# Altium PCB Cree_Testing_Board_R0.PcbDoc
Units mil, origin at the board's own origin, x right, y up, seen from the top; angles counter-clockwise.
Board outline 1100 x 975 mil, 2 copper layers (Top Layer, Bottom Layer); 8 components, 7 nets, 30 pads, 0 vias.
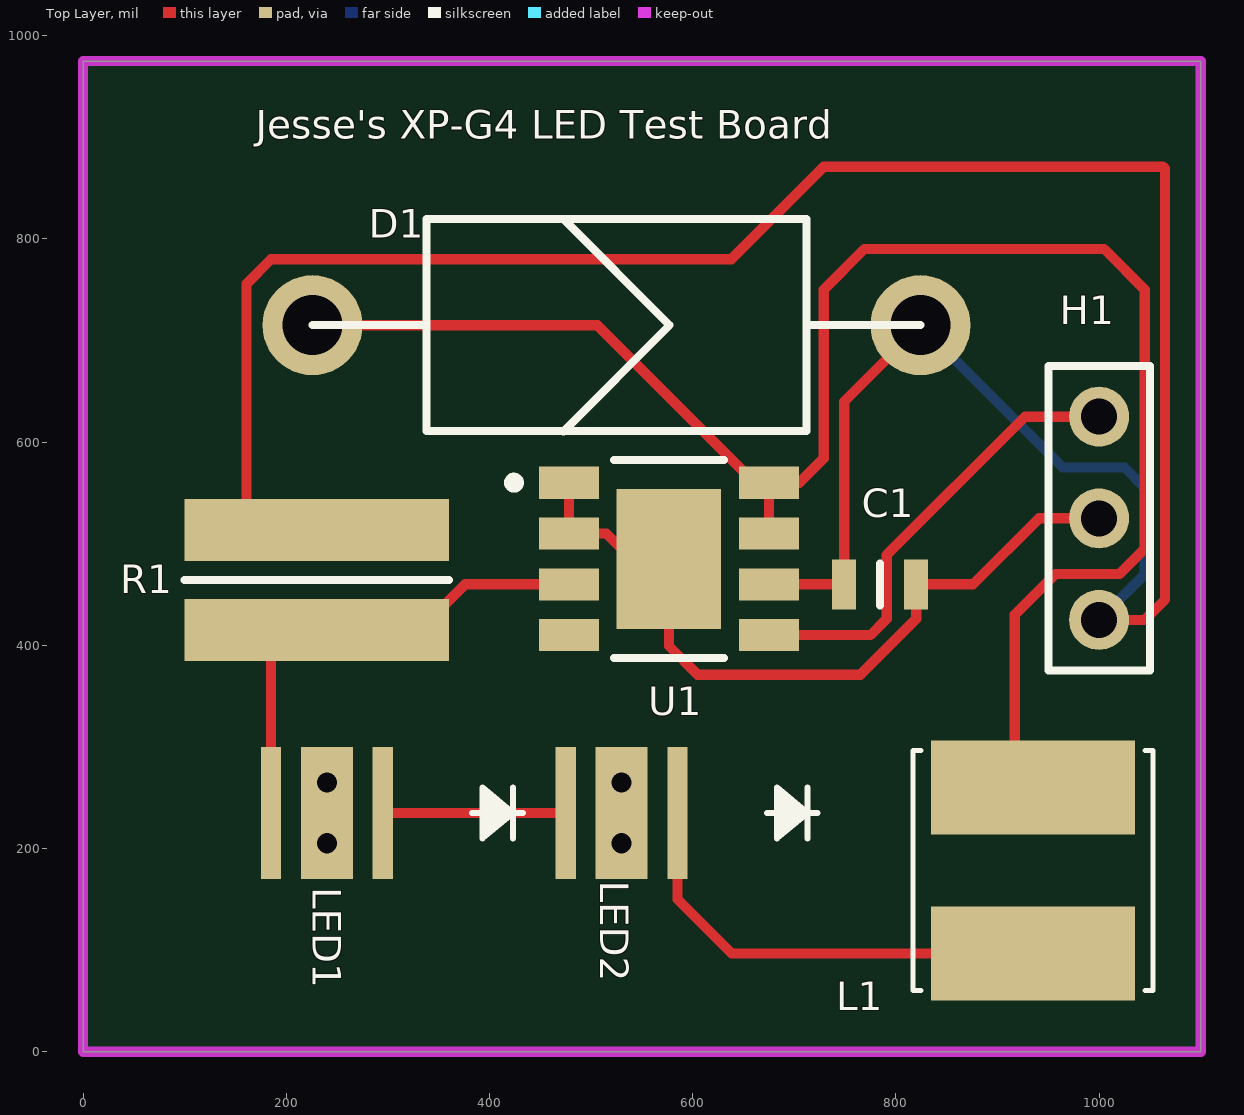
[diagram p0: Top Layer view]
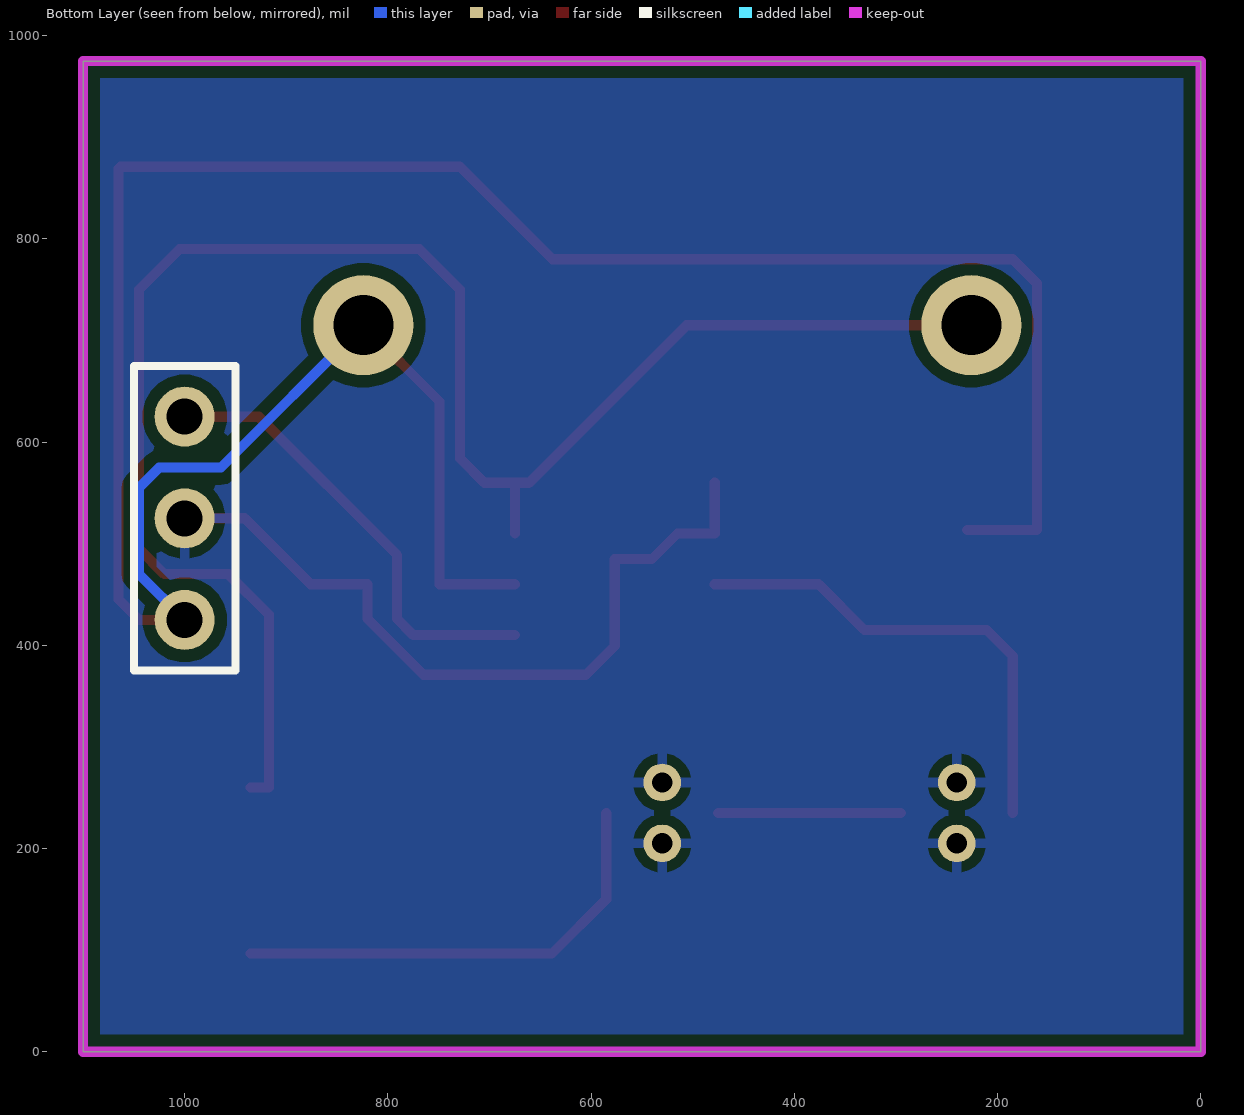
[diagram p1: Bottom Layer view, seen from below]
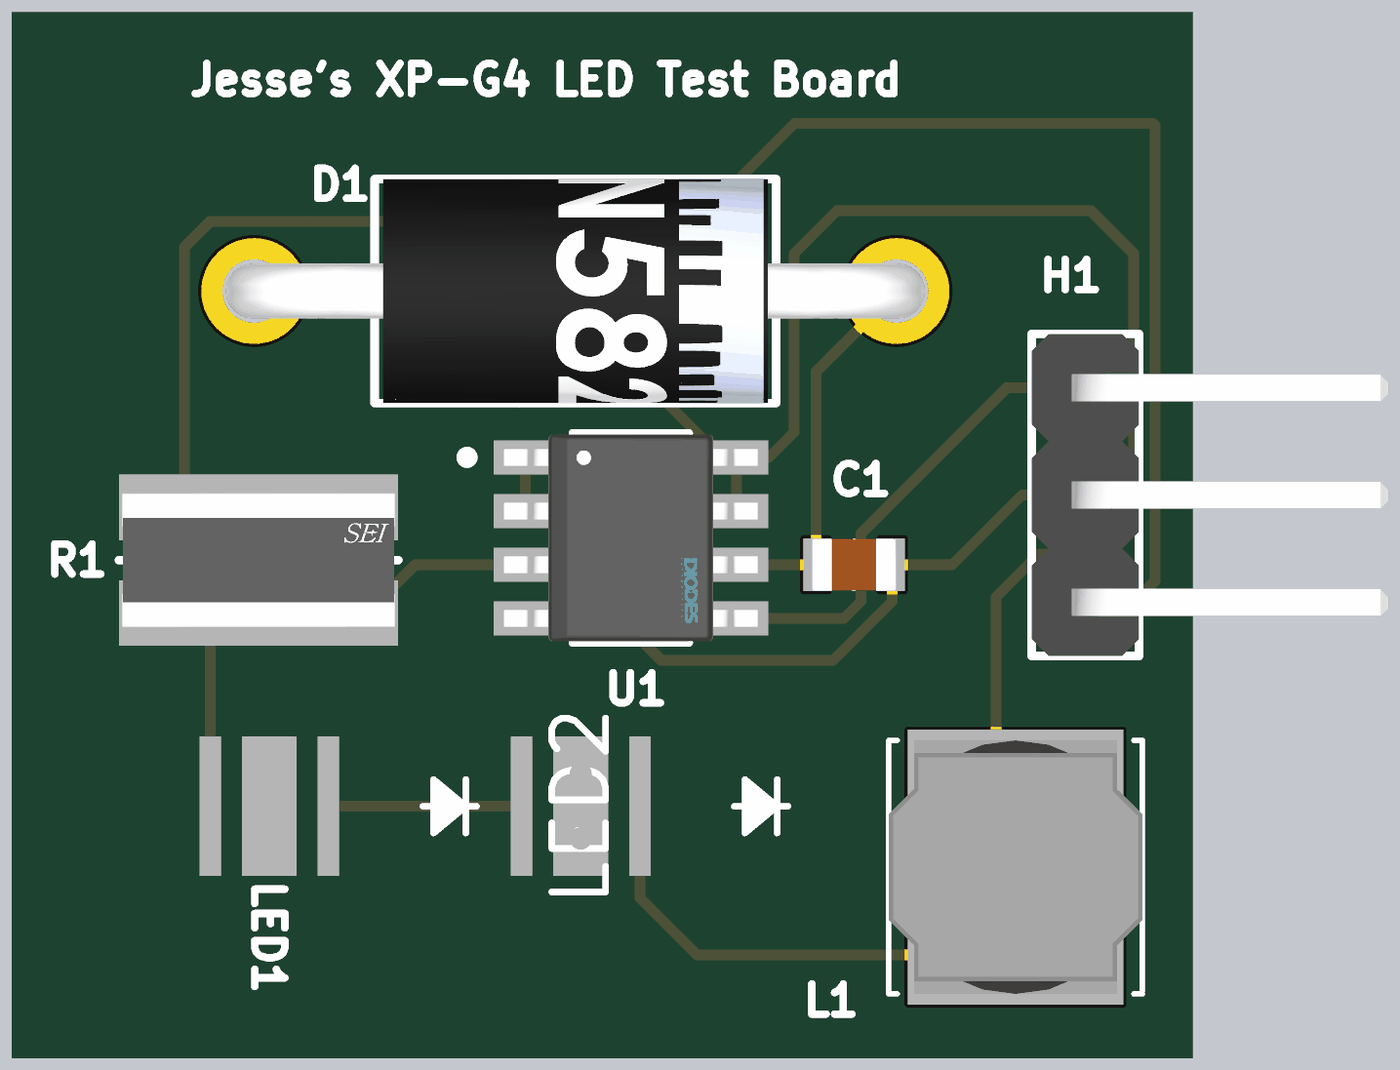
[diagram p2: 3D render of the assembled board from above, using the file's embedded part models]

## Layer stack, top to bottom
Top Solder: solder mask 0.4, Solder Resist, Dk 3.5
Top Layer: signal copper 1.4
Dielectric 1: dielectric 12.6, FR-4, Dk 4.8
Bottom Layer: signal copper 1.4
Bottom Solder: solder mask 0.4, Solder Resist, Dk 3.5

## Board outline
0,0 0,975 1100,975 1100,0

## Design rules (kind name [scope] priority, off if disabled: settings)
BoardOutlineClearance [All] p1: gap=7.87 ignorepadtopadclearanceinfootprint=FALSE
Clearance "inPolygon Clearance" [InPolygon] p1: gap=11.81 ignorepadtopadclearanceinfootprint=TRUE // this rule ensures that every net within a polygon of a different net has a set clearance from the poly
Clearance "Different Diff Pair" [All] p2: gap=7.87 ignorepadtopadclearanceinfootprint=TRUE
Clearance "Same Diff Pair" [All] p3: gap=3.94 ignorepadtopadclearanceinfootprint=TRUE
Clearance "Different Nets" [not InAnyDifferentialPair] p4: gap=11.81 ignorepadtopadclearanceinfootprint=TRUE except(3.94: Arc-SMDPad Arc-THPad Arc-Via Arc-Text Track-SMDPad Track-THPad Track-Via Track-Text SMDPad-Text THPad-Text Via-Text Fill-Text Poly-Text Region-Text Text-Text; 4.72: Arc-Arc Arc-Track Track-Track; 5.91: SMDPad-SMDPad SMDPad-THPad SMDPad-Via THPad-THPad THPad-Via Via-Via; 7.87: Arc-Hole Track-Hole SMDPad-Hole THPad-Hole Via-Hole Fill-Hole Poly-Hole Region-Hole Text-Hole)
Clearance "Same Net" [not InAnyDifferentialPair] p5: gap=0 ignorepadtopadclearanceinfootprint=TRUE except(3.94: THPad-Via; 7.09: Arc-Arc Arc-Track Track-Track)
ComponentClearance [All] p1: gap=4 collisioncheckmode=3 verticalgap=4 showdistances=TRUE
DiffPairsRouting "Ethernet Routing" [InDifferentialPairClass('Ethernet_Pairs')] p1: maxlimit=7.87 minlimit=7.87 mostfreqgap=7.87 toplayer_minwidth=9.84 toplayer_maxwidth=9.84 toplayer_prefwidth=9.84 bottomlayer_minwidth=9.84 bottomlayer_maxwidth=9.84 bottomlayer_prefwidth=9.84 impedanceprofiledriven=TRUE maxuncoupledlength=500
DiffPairsRouting "USB Routing" [InDifferentialPairClass('USB_Pairs')] p2: maxlimit=4.99 minlimit=4.99 mostfreqgap=4.99 toplayer_minwidth=9.07 toplayer_maxwidth=9.07 toplayer_prefwidth=9.07 bottomlayer_minwidth=9.07 bottomlayer_maxwidth=9.07 bottomlayer_prefwidth=9.07 maxuncoupledlength=500
DiffPairsRouting "CAN Routing" [InDifferentialPairClass('CAN_Pairs')] p3: maxlimit=19.68 minlimit=19.68 mostfreqgap=19.68 toplayer_minwidth=7.93 toplayer_maxwidth=7.93 toplayer_prefwidth=7.93 bottomlayer_minwidth=7.93 bottomlayer_maxwidth=7.93 bottomlayer_prefwidth=7.93 impedanceprofiledriven=TRUE maxuncoupledlength=500
Height [All] p1: minheight=0 maxheight=71497.94 prefheight=500
HoleSize [All] p1: absolutevalues=TRUE maxlimit=248.03 minlimit=11.81 maxpercent=80.000 minpercent=20.000
HoleToHoleClearance [All] p1: gap=9.84 allowstackedmicrovias=FALSE
MatchedLengths "XTAL Nets Matched Delays" [InNetClass('XTAL_Nets')] p1: tolerance=1000 checknetsindiffpair=FALSE checkdiffpairvsdiffpair=TRUE checkxsignals=TRUE checkothers=TRUE usedelayunits=TRUE delaytolerance=10.000000
MatchedLengths "Diff Pair Matched Delays" [InDifferentialPairClass('Ethernet_Pairs') or InDifferentialPairClass('USB_Pairs') or InDifferentialPairClass('CAN_Pairs')] p2: tolerance=196.85 checknetsindiffpair=TRUE checkdiffpairvsdiffpair=FALSE checkxsignals=FALSE checkothers=FALSE usedelayunits=TRUE delaytolerance=100.000000 phasematching=TRUE phasedelaytolerance=5.000000 phasedistance=500
MinimumAnnularRing [All] p1: minimumring=7.87
MinimumSolderMaskSliver [All] p1: minsoldermaskwidth=0
PlaneClearance "Supply Net Clearance" [InNetClass('Supply_Nets')] p1: clearance=19.68
PlaneClearance "All Nets" [All] p2: clearance=11.81
PolygonConnect "Supply Nets" [InNetClass('Supply_Nets')] p1: connectstyle=Relief reliefconductorwidth=11.81 reliefentries=4 polygonreliefangle="90 Angle" conductorbypadedge=TRUE mindistance=15 enablemindistance=FALSE airgapwidth=10
PolygonConnect General [All] p2: connectstyle=Relief reliefconductorwidth=10 reliefentries=4 polygonreliefangle="90 Angle" airgapwidth=10
RoutingVias [All] p1: holewidth=7.87 width=13.78 viastyle="Through Hole" minholewidth=5.91 minwidth=11.81 maxholewidth=248.03 maxwidth=257.87
SilkToSilkClearance [All] p1: silktosilkclearance=0
SilkToSolderMaskClearance [All] p1: minsilkscreentomaskgap=0 clearancetoexposedcopper=TRUE
SolderMaskExpansion [All] p1: expansion=2.95 istentingtop=FALSE
SupplyNets "Schematic Supply Nets_7" [InNet('+1V1')] p1: voltage=1.100
SupplyNets "Schematic Supply Nets_6" [InNet('+3V3')] p2: voltage=3.300
SupplyNets "Schematic Supply Nets_5" [InNet('XOUT')] p3: voltage=0.000
SupplyNets "Schematic Supply Nets_4" [InNet('+5V')] p4: voltage=5.000
SupplyNets "Schematic Supply Nets_2" [InNet('XIN')] p5: voltage=0.000
SupplyNets "Schematic Supply Nets" [InNet('RUN')] p6: voltage=0.000
SupplyNets "Schematic Supply Nets_3" [InNet('GND')] p7: voltage=0.000
SupplyNets "Schematic Supply Nets_1" [InNet('Earth')] p8: voltage=0.000
UnRoutedNet [All] p1: checkbadconnections=TRUE
Width "nRF Width" [InNetClass('nRF Signal')] p1: maxlimit=14.94 minlimit=14.94 preferedwidth=14.94 impedanceprofiledriven=TRUE minimp=50.000000 maximp=50.000000 favimp=50.000000 checkconnectedcopper=TRUE
Width [All] p2: maxlimit=3937.01 minlimit=3.94 preferedwidth=7.87
20 further rules are at their usual default settings.

## Classes and differential pairs
component class Cree_Testing_Board: C1 D1 H1 L1 LED1 R1 U1

## Components (designator, comment, footprint, x,y, rotation, side; value= is the part's Value field where it differs from the comment)
C1 "[Cap] 0805 4.7uF 10% 50V" "[Cap] SMD 0805" 784.57,460 r0 top
D1 "1N5822" "[Diode] Thru-Hole" 525,715 r180 top
H1 "[Header] 1x3 90deg Male" "[Header] 1x3 90deg Male" 1000,525 r90 top
L1 "SRN6045TA-330M" IND_SRN6045TA-330M 935,178.31 r270 top
LED1 "XPGWHT-01-0000-00DC4" LED_CREE_XPG 240,235 r270 top
LED2 "XPGWHT-01-0000-00DC4" LED_CREE_XPG 530,235 r270 top
R1 "CSR1225JKR100" FP-CSR1225-IPC_B 230,464.26 r270 top (schematic designator 1)
U1 "AL8843SP-13" FP-SO-8EP-MFG 576.67,485 r0 top

## Footprints (in the part's own frame and the unit in brackets; to place one, negate y for a bottom-side part, rotate by r counter-clockwise, add the part's x,y. Pads: shape width x height; smd on the part's side, far side on the other; paste and mask are expansions set on the pad)
"[Cap] SMD 0805" [mm]
  rect 0.6x1.25 smd: 1(-0.9,0) 2(0.9,0)
  silkscreen extent 0,-0.53 0,0.53, body extent -1,-0.63 1,0.63, height 1
"[Diode] Thru-Hole" [mm] "1N5822"
  round 2.5 hole 1.5: 1(-7.6,0) 2(7.6,0)
  silkscreen extent -7.6,-2.66 7.6,2.66, body extent -8.27,-2.66 8.27,2.66, height 7.16
"[Header] 1x3 90deg Male" [mm]
  round 1.5 hole 0.9: 1(-2.54,0) 2(0,0) 3(2.54,0)
  silkscreen extent -3.81,-1.27 3.81,1.27, body extent -3.81,-7.18 3.81,1.27, height 4.3
FP-CSR1225-IPC_B [mil]
  rect 61.25x260.17 smd paste+0 mask+0: 1(-49.26,0) 2(49.26,0)
  silkscreen extent 0,-130 0,130, body extent -90,-140 90,140, height 10
FP-SO-8EP-MFG [mm]
  rect 1.505x0.802 smd paste+0 mask+0: 1(-2.498,1.905) 2(-2.498,0.635) 3(-2.498,-0.635) 4(-2.498,-1.905) 5(2.498,-1.905) 6(2.498,-0.635) 7(2.498,0.635) 8(2.498,1.905)
  rect 2.613x3.502 smd paste+0 mask+0: 9(0,0)
  silkscreen extent -4,-2.47 1.37,2.47, body extent -3.35,-2.58 3.35,2.58, height 0.25
IND_SRN6045TA-330M [mm]
  rect 2.35x5.1 smd: 1(-2.075,0) 2(2.075,0)
  silkscreen extent -3,-3 3,3, body extent -3,-3 3,3, height 4.5
LED_CREE_XPG [mil]
  rect 130x20 smd paste+0 mask+0: 1(0,55) 3(0,-55)
  rect 130x51 smd paste+0 mask+0: 2(0,0)
  silkscreen extent -25,143 25,193

## Part data
C1: "GRT21BR61H475KE13L", Capacitance=4.7uF, Max Voltage=50V, Size Package=0805, Supplier Part Number 1=490-12394-1-ND, Tolerance=10%, Supplier 1=DigiKey
D1: library part "[Schottky] Thru-Hole 40V 3A", Supplier Part Number 1=1N5822GOS-ND, Supplier 1=DigiKey
H1: "2.54mm pitch"
L1: "Inductors, Fixed, 33uH 20% 1.5A shd SMD AEC-Q200", Package="Nonstandard Bourns", Check_prices=https://www.snapeda.com/parts/SRN6045TA-330M/Bourns/view-part/?ref=eda, MF=Bourns, MP=SRN6045TA-330M, SnapEDA_Link=https://www.snapeda.com/parts/SRN6045TA-330M/Bourns/view-part/?ref=snap
LED1 LED2: "No Description Available", Manufacturer_Name="Cree LED", VALUE_2=Value, Copyright="Copyright (C) 2026 Ultra Librarian. All rights reserved.", Manufacturer_Part_Number=XPGWHT-01-0000-00DC4
R1: library part CMP-26527-003070-1, "General Purpose Thick Film Chip Resistor, 1225, 0.1Ω, 5%, 100ppm/°C, 3W", Case Code (Imperial)=2512, Case Code (Metric)=6432, Case/Package=1225, Max Operating Temperature=155°C, Max Power Dissipation=3W, Min Operating Temperature=-55°C, Package Quantity=1000, Resistance=100mR, Resistor Type="Thick Film", Temperature Coefficient=100ppm/°C, Tolerance=5%, Height=0.041inch, Length=0.122inch, Mount="Surface Mount", Number of Terminations=2, Packaging="Tape and Reel", RoHS Compliant=Yes, Series=CSR, Width=0.248inch
U1: library part CMP-12753-000007-1, "IC LED MV INT SWITCH SO-8EP", Ambient Temperature Range High=+105°C, Ambient Temperature Range Low=-40°C, Manufacturer="Diodes Inc.", Max Junction Temp=+125°C, Max Supply Voltage=40V, Min Supply Voltage=4.5V, Nominal Supply Current=0.35mA, Output Current=3A, Output Voltage=36V, Package=SO-8EP, Switching Frequency=1MHz, Temperature="-40°C to +125°C", Automotive=No, Category=IC, ComponentLink2Description=Datasheet, ComponentLink2URL=https://www.diodes.com/assets/Datasheets/AL8843.pdf, Device Class L1="Integrated Circuits (ICs)", Device Class L2="Power Management ICs", Device Class L3="LED Drivers", Digikey Description="IC LED MV INT SWITCH SO-8EP", Dimming=Analog,PWM, Footprint Url=https://www.diodes.com/assets/Package-Files/SO-8EP.pdf, Height=1.63mm, Ipc Land Pattern Name=SOP127P600X163-8, Lead Free=Yes, Manufacturer Part Number=AL8843SP-13, Number Of Outputs=1, Octopart=https://octopart.com/al8843sp-13-diodes+inc.-88289989, RoHS=TRUE, Standoff Height=0mm, Switching Topology=Buck, Temperature Range High=+125°C, Temperature Range Low=-40°C

## Free pads (board coordinates)
  round 37 hole 20: 2(240,205) 2(240,265) 2(530,205) 2(530,265)

## Nets (pads, with @x,y where several pads share a name; then routed paths per layer and width w, separated by ;. In a path a pad name is that pad's centre, name@x,y a point inside that pad or via, vN(x,y) a via of type N, cw(c..) or ccw(c..) an arc to the next point about the centre after c; other vN are vias at no path point)
CONTROL: H1.3 U1.5 | length 451
  Top Layer w10: U1.5 775,410 791,426 791,489 927,625 H1.3
GND: C1.2 H1.2 LED1.2 LED2.2 pad.2 U1.1 U1.2 U1.9 | length 763.1
  Top Layer w10: U1.1 U1.2 515,510 540,485 U1.9 576.67,399.33 605,371 765,371 820,426 C1.2 875.96,460 940.96,525 H1.2
NetD1_2: D1.2 L1.1 U1.7 U1.8 | length 1740.4
  Top Layer w10: D1.2 506,715 661,560 U1.8 ; U1.7 U1.8 ; L1.1 917,260 917,430 957,470 1020,470 1045,495 1045,750 1005,790 769,790 729,750 729,584 705,560 U1.8
NetL1_2: L1.2 LED2.1 | length 457.1
  Top Layer w10: LED2.1 585,150 638.39,96.61 L1.2
NetLED1_1: LED1.1 LED2.3 | length 180
  Top Layer w10: LED1.1 LED2.3
SET: LED1.3 R1.2 U1.3 | length 477
  Top Layer w10: LED1.3 185,389.38 210.62,415 331,415 376,460 U1.3
VCC: C1.1 D1.1 H1.1 R1.1 U1.6 | length 2557.2
  Top Layer w10: R1.1 161,513.52 161,756 185,780 638,780 729,871 1063,871 1065,869 1065,445 1045,425 H1.1 ; U1.6 C1.1 749.13,639.92 D1.1
  Bottom Layer w10: D1.1 964.21,575 1025,575 1045,555 1045,470 H1.1
pads on no net: U1.4

## Polygon pours and split planes (outlines as drawn)
GND on Bottom Layer "NONET_L01_P-001" (solid, pour order 1): 0,975 1100,975 1100,0 0,0

## Keep-outs
Keep-Out Layer:
  the board outline again, w10

## Silkscreen, mask and mechanical layers (free items; w line width, h text height)
Top Overlay:
  text "Jesse's XP-G4 LED Test Board" at 169.79,898.67 h28